# Altium PCB PCB.PcbDoc (part 5 of 8)
Units mm, origin at the board's own origin, x right, y up, seen from the top; angles counter-clockwise.
Board outline 78.8 x 69 mm, 12 copper layers (Top Layer, GND_12, uStrip1, GND_35, Clocks, GND_57, POWER, Slow_Ctrl, GND_810, uStrip2, GND_1012, Bottom Layer), stack 2.926 mm thick; 460 components, 314 nets, 1929 pads, 3409 vias.
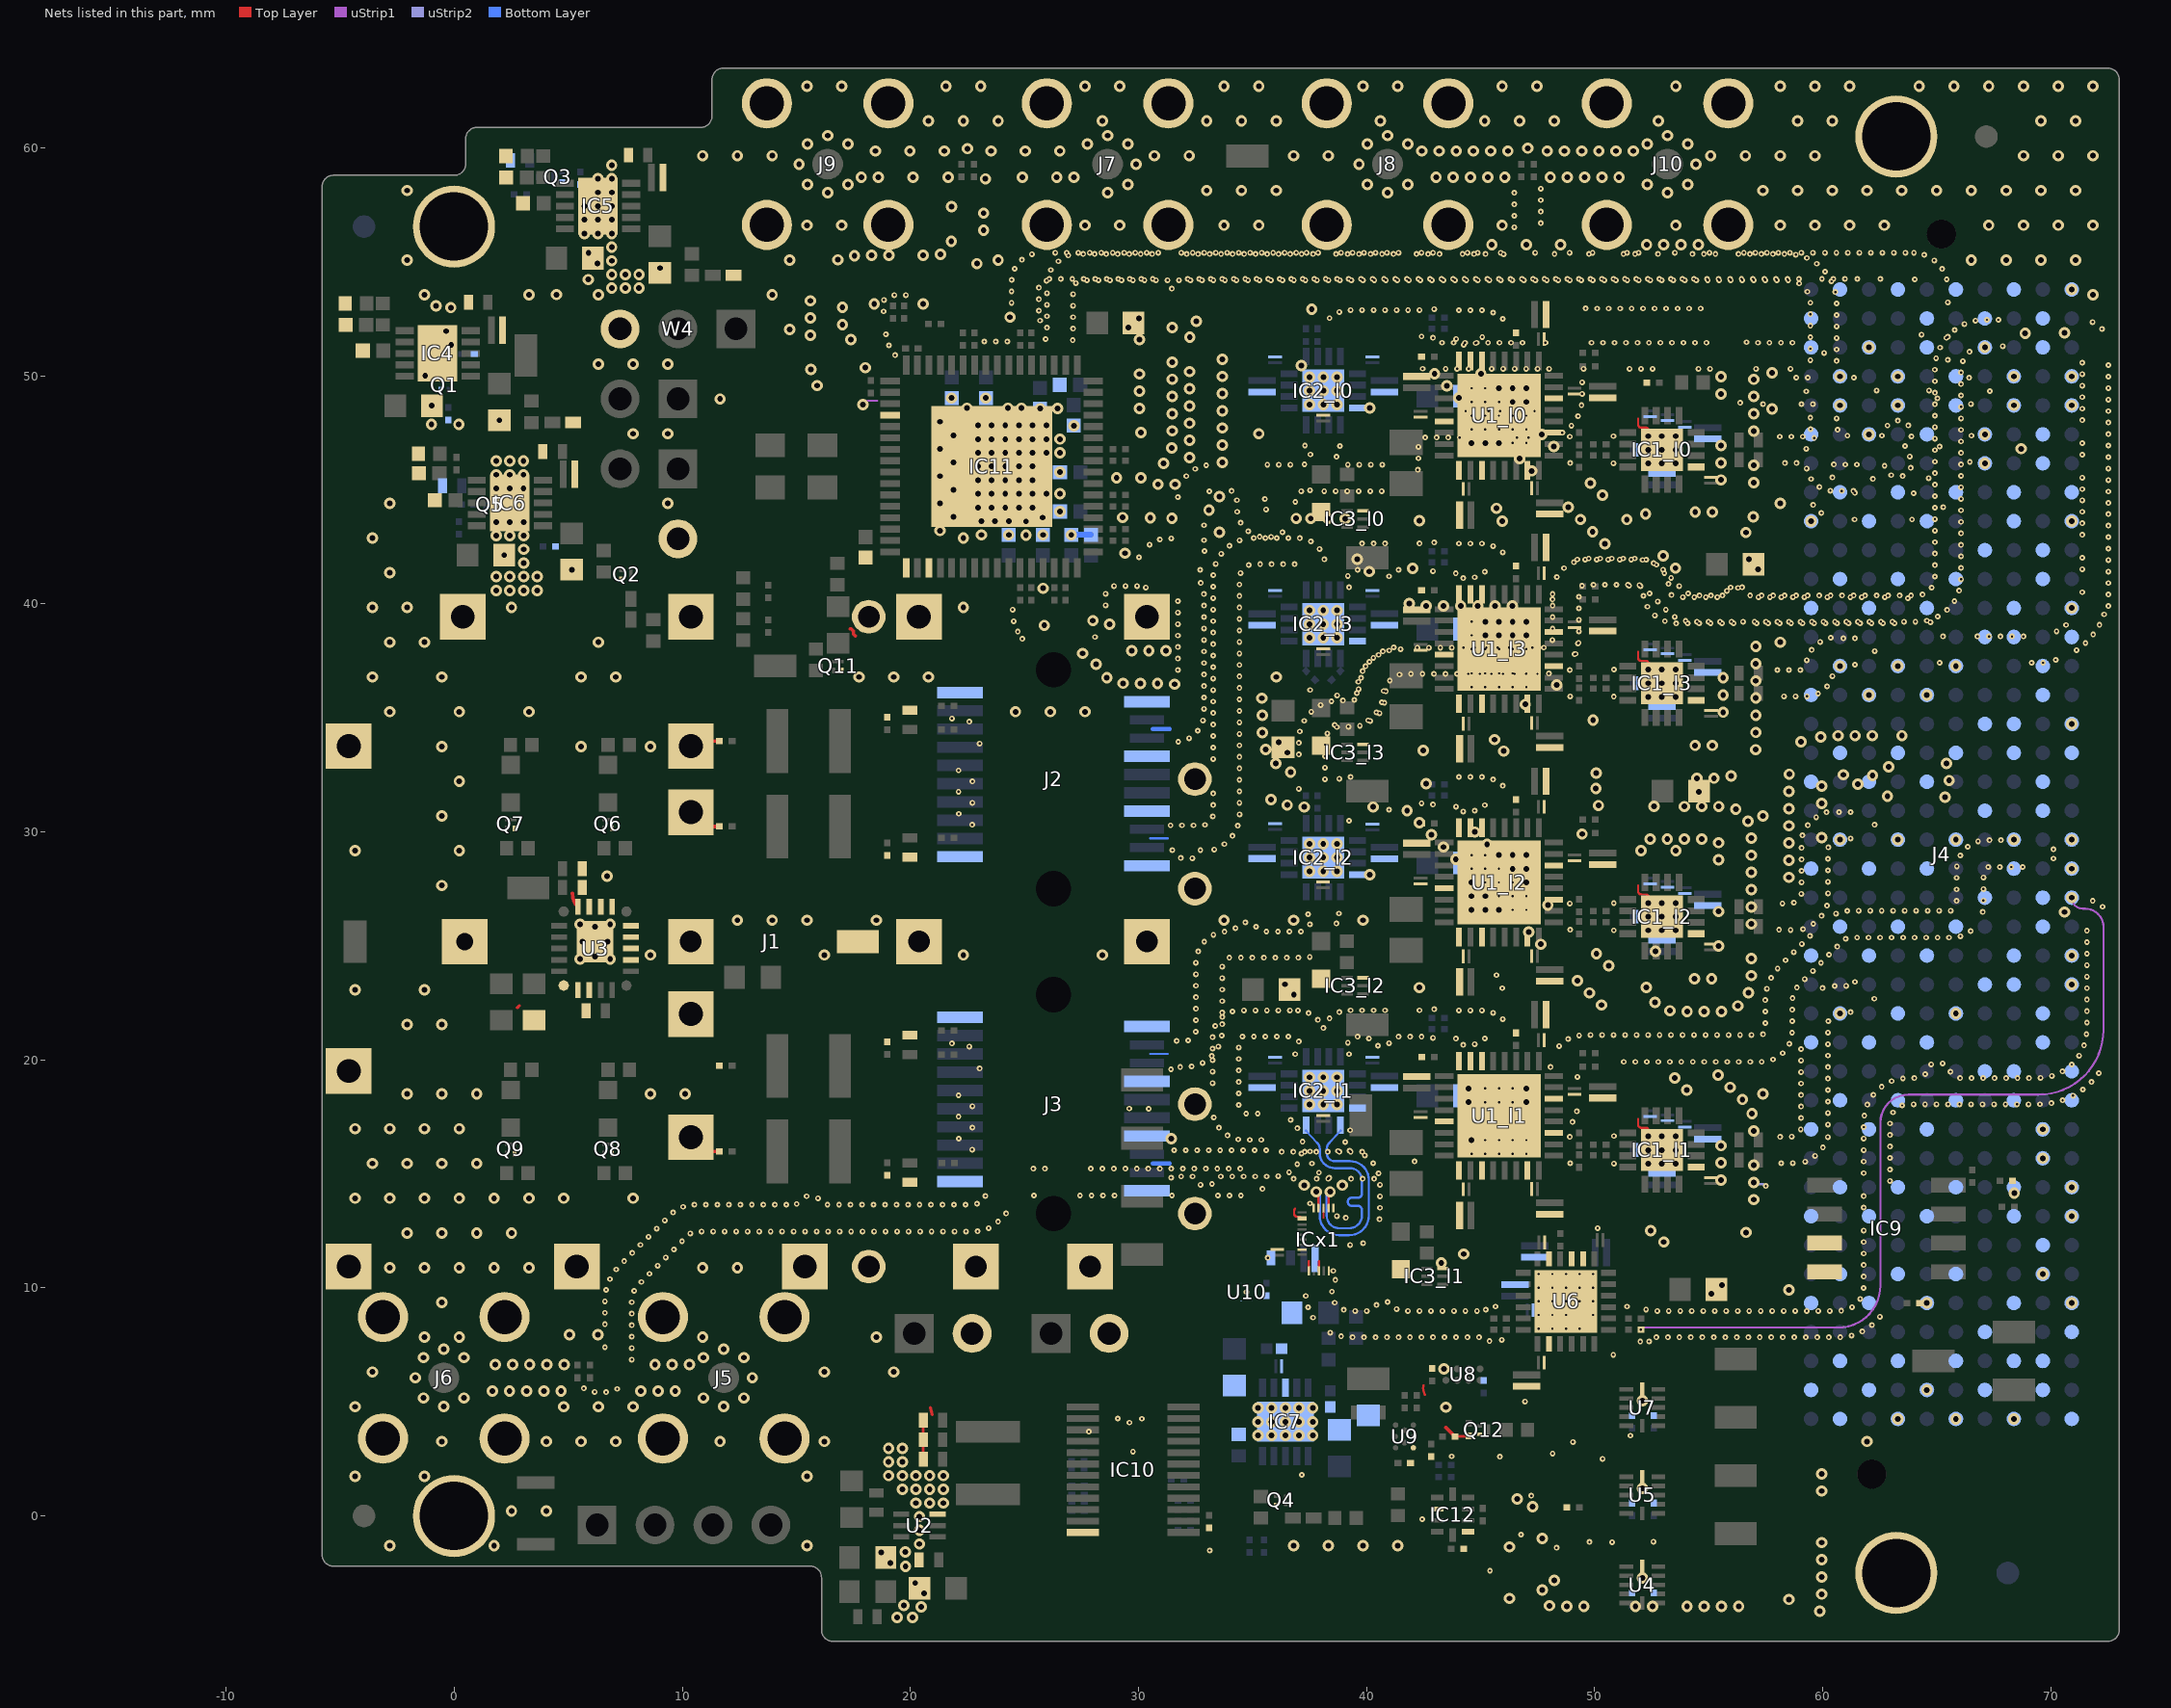
[diagram p14: the nets of this part, all layers, seen from the top]

## Via types
v1: diameter 0.25, hole 0.1, Top Layer to uStrip1, tented both sides, 1130 vias
v2: diameter 0.25, hole 0.1, uStrip2 to Bottom Layer, tented both sides, 686 vias
v3: diameter 0.5, hole 0.25, Top Layer to Bottom Layer, tented both sides, 674 vias
v4: diameter 0.5, hole 0.25, Top Layer to Bottom Layer, 632 vias
v5: diameter 0.5, hole 0.25, uStrip1 to uStrip2, tented both sides, 281 vias
v6: diameter 0.584, hole 0.483, Top Layer to Bottom Layer, tented both sides, 6 vias

## Nets (pads, with @x,y where several pads share a name; then routed paths per layer and width w, separated by ;. In a path a pad name is that pad's centre, name@x,y a point inside that pad or via, vN(x,y) a via of type N, cw(c..) or ccw(c..) an arc to the next point about the centre after c; other vN are vias at no path point) (continued)
FPGA_TX1_P: C83.2 J4.A22 | length 37.5
  uStrip1 w0.094: v1(52.027,8.165) cw(c52.124,8.165) 52.124,8.263 60.685,8.263 ccw(c60.685,10.104) 62.527,10.104 62.527,17.251 cw(c63.755,17.251) 63.755,18.479 66.771,18.479 69.464,18.479 ccw(c69.464,21.324) 72.309,21.324 72.309,25.832 ccw(c71.503,25.832) 71.503,26.637 71.4,26.637 cw(c71.4,27.12) v5(70.918,27.12)
  other v2: 70.918,27.12
FPGA_TX1_PS_N: IC2_l1.4 ICx1.7 | length 10.3
  Top Layer w0.099: ICx1.7@38.328,13.507 38.328,14.146 cw(c38.399,14.146) v1(38.399,14.216)
  Bottom Layer w0.099: IC2_l1.4@37.341,16.896 37.829,16.369 cw(c37.542,16.082) 37.947,16.082 37.947,15.907 ccw(c38.598,15.907) 38.598,15.256 39.273,15.256 cw(c39.273,14.737) 39.793,14.737 39.793,14.535 39.793,14.133 cw(c39.617,14.133) 39.617,13.956 39.348,13.956 ccw(c39.348,13.78) 39.348,13.603 39.617,13.603 cw(c39.617,13.427) 39.793,13.427 39.793,13.178 cw(c39.232,13.178) 39.232,12.617 38.802,12.617 cw(c38.802,13.169) 38.25,13.169 38.25,14.068 cw(c38.399,14.068) v1(38.399,14.216)
  other v2: 38.399,14.216
  other v5: 38.399,14.216
FPGA_TX1_PS_P: IC2_l1.1 ICx1.9 | length 10.3
  Top Layer w0.099: v2(37.797,14.216) cw(c37.797,14.123) 37.89,14.123 ICx1.9@37.89,13.507
  Bottom Layer w0.099: v2(37.797,14.216) cw(c37.797,14.068) 37.945,14.068 37.945,13.169 ccw(c38.802,13.169) 38.802,12.312 39.232,12.312 ccw(c39.232,13.178) 40.098,13.178 40.098,14.737 ccw(c39.273,14.737) 39.273,15.561 38.598,15.561 cw(c38.598,15.907) 38.252,15.907 38.252,16.082 cw(c38.658,16.082) 38.371,16.369 IC2_l1.1@38.859,16.896
  other v1: 37.797,14.216
  other v5: 37.797,14.216
GND: C1_l0.1 C1_l1.1 C1_l2.1 C1_l3.1 C2_l0.1 C2_l1.1 C2_l2.1 C2_l3.1 C3_l0.1 C3_l1.1 C3_l2.1 C3_l3.1 C4_l0.1 C4_l1.1 C4_l2.1 C4_l3.1 C5_l0.1 C5_l1.1 C5_l2.1 C5_l3.1 C6_l0.1 C6_l1.1 C6_l2.1 C6_l3.1 C7_l0.1 C7_l1.1 C7_l2.1 C7_l3.1 C8_l0.1 C8_l1.1 C8_l2.1 C8_l3.1 C9_l0.1 C9_l1.1 C9_l2.1 C9_l3.1 C10_l0.1 C10_l1.1 C10_l2.1 C10_l3.1 C11_l0.1 C11_l1.1 C11_l2.1 C11_l3.1 C14_l0.1 C14_l1.1 C14_l2.1 C14_l3.1 C15_l0.1 C15_l1.1 C15_l2.1 C15_l3.1 C16_l0.1 C16_l1.1 C16_l2.1 C16_l3.1 C17_l0.1 C17_l1.1 C17_l2.1 C17_l3.1 C19_l0.1 C19_l1.1 C19_l2.1 C19_l3.1 C20_l0.1 C20_l1.1 C20_l2.1 C20_l3.1 C21_l0.1 C21_l1.1 C21_l2.1 C21_l3.1 C22_l0.1 C22_l1.1 C22_l2.1 C22_l3.1 C23_l0.1 C23_l1.1 C23_l2.1 C23_l3.1 C25_l0.1 C25_l1.1 C25_l2.1 C25_l3.1 C26_l0.1 C26_l1.1 C26_l2.1 C26_l3.1 C27_l0.1 C27_l1.1 C27_l2.1 C27_l3.1 C28_l0.1 C28_l1.1 C28_l2.1 C28_l3.1 C31_l0.1 C31_l1.1 C31_l2.1 C31_l3.1 C33.1 C34.1 C35.1 C36.1 C37.1 C38.1 C39.1 C40.2 C42.2 C43.1 C44.1 C45.1 C46.1 C47.1 C49.1 C50.1 C51.1 C52.1 C53.1 C54.1 C55.1 C56.1 C57.1 C58.1 C59.1 C60.1 C61.1 C62.1 C63.2 C64.1 C65.1 C66.1 C67.1 C68.2 C69.1 C70.1 C71.1 C72.1 C73.1 C74.1 C75.1 C76.1 C77.1 C78.1 C79.1 C80.1 C89.1 C90.1 C92.1 C93.1 C94.1 C95.1 C115.1 C116.1 C117.1 C118.1 C121.1 C122.1 C123.1 C124.1 C125.1 C126.1 C127.1 C128.1 C129.1 C130.1 C131.1 C132.1 C133.1 C134.1 C135.1 C136.1 C137.1 C138.1 C139.1 C142.1 C145.2 C146.1 C147.1 C148.2 C149.2 C150.1 C151.1 D1.1 D2.1 IC1_l0.9 IC1_l0.17 IC1_l1.9 IC1_l1.17 IC1_l2.9 IC1_l2.17 IC1_l3.9 IC1_l3.17 IC2_l0.16 IC2_l0.17 IC2_l1.16 IC2_l1.17 IC2_l2.16 IC2_l2.17 IC2_l3.16 IC2_l3.17 IC3_l0.3 IC3_l1.3 IC3_l2.3 IC3_l3.3 IC4.11 IC5.11 IC6.11 IC7.8 IC7.11 IC9.3 IC9.4 IC10.12 IC11.4 IC11.17 IC11.19 IC11.65 IC12.1 IC12.7 ICx1.1 ICx1.3 ICx1.5 ICx1.6 ICx1.8 ICx1.10 ICx1.12 ICx1.18 J1.1 J1.2 J1.3 J1.4 J1.5 J1.6 J1.7 J1.8 J1.9 J1.10 J1.11 J1.12 J1.13 J1.14 J1.15 J1.16 J1.17 J1.18 J1.19 J1.20 J1.21 J1.22 J1.23 J1.24 J1.25 J1.26 J1.27 J1.28 J1.29 J1.30 J1.31 J1.32 J1.33 J1.34 J1.35 J1.36 J1.37 J2.1 J2.10 J2.11 J2.14 J2.17 J2.20 J3.1 J3.10 J3.11 J3.14 J3.17 J3.20 J4.A1 J4.A4 J4.A5 J4.A8 J4.A9 J4.A12 J4.A13 J4.A16 J4.A17 J4.A20 J4.A21 J4.A24 J4.A25 J4.A28 J4.A29 J4.A32 J4.A33 J4.A36 J4.A37 J4.A40 J4.B2 J4.B3 J4.B6 J4.B7 J4.B10 J4.B11 J4.B14 J4.B15 J4.B18 J4.B19 J4.B22 J4.B23 J4.B26 J4.B27 J4.B30 J4.B31 J4.B34 J4.B35 J4.B38 J4.B39 J4.C1 J4.C4 J4.C5 J4.C8 J4.C9 J4.C12 J4.C13 J4.C16 J4.C17 J4.C20 J4.C21 J4.C24 J4.C25 J4.C28 J4.C29 J4.C32 J4.C33 J4.C36 J4.C38 J4.C40 J4.D2 J4.D3 J4.D6 J4.D7 J4.D10 J4.D13 J4.D16 J4.D19 J4.D22 J4.D25 J4.D28 J4.D37 J4.D39 J4.E1 J4.E4 J4.E5 J4.E8 J4.E11 J4.E14 J4.E17 J4.E20 J4.E23 J4.E26 J4.E29 J4.E32 J4.E35 J4.E38 J4.E40 J4.F2 J4.F3 J4.F6 J4.F9 J4.F12 J4.F15 J4.F18 J4.F21 J4.F24 J4.F27 J4.F30 J4.F33 J4.F36 J4.F39 J4.G1 J4.G4 J4.G5 J4.G8 J4.G11 J4.G14 J4.G17 J4.G20 J4.G23 J4.G26 J4.G29 J4.G32 J4.G35 J4.G38 J4.G40 J4.H3 J4.H6 J4.H9 J4.H12 J4.H15 J4.H18 J4.H21 J4.H24 J4.H27 J4.H30 J4.H33 J4.H36 J4.H39 J4.I1 J4.I4 J4.I5 J4.I8 J4.I11 J4.I14 J4.I17 J4.I20 J4.I23 J4.I26 J4.I29 J4.I32 J4.I35 J4.I38 J4.I40 J4.J2 J4.J3 J4.J6 J4.J9 J4.J12 J4.J15 J4.J18 J4.J21 J4.J24 J4.J27 J4.J30 J4.J33 J4.J36 J4.J39 J5.2 J5.2_1 J5.2_2 J5.2_3 J6.2 J6.2_1 J6.2_2 J6.2_3 J7.2 J7.2_1 J7.2_2 J7.2_3 J8.2 J8.2_1 J8.2_2 J8.2_3 J9.2 J9.2_1 J9.2_2 J9.2_3 J10.2 J10.2_1 J10.2_2 J10.2_3 LED1_l0.1 LED1_l1.1 LED1_l2.1 LED1_l3.1 pad.frame-holes Q1.2 Q2.2 Q3.2 Q4.2 Q5.2 Q6.2 Q7.2 Q8.2 Q9.2 Q11.2 Q12.2 R5_l0.1 R5_l1.1 R5_l2.1 R5_l3.1 R10.1 R12.1 R16.1 R18.1 R22.1 R26.1 R27.1 R30.1 R32.1 R35.1 R39.1 R40.1 R59.1 R64.1 R78.1 R79.1 TP6.1 U1_l0.6 U1_l0.7 U1_l0.8 U1_l0.13 U1_l0.17 U1_l0.19 U1_l0.23 U1_l0.27 U1_l0.30 U1_l0.33 U1_l1.6 U1_l1.7 U1_l1.8 U1_l1.13 U1_l1.17 U1_l1.19 U1_l1.23 U1_l1.27 U1_l1.30 U1_l1.33 U1_l2.6 U1_l2.7 U1_l2.8 U1_l2.13 U1_l2.17 U1_l2.19 U1_l2.23 U1_l2.27 U1_l2.30 U1_l2.33 U1_l3.6 U1_l3.7 U1_l3.8 U1_l3.13 U1_l3.17 U1_l3.19 U1_l3.23 U1_l3.27 U1_l3.30 U1_l3.33 U2.3 U3.3 U3.4 U3.5 U3.6 U3.8 U3.9 U3.10 U3.11 U3.18 U3.19 U3.20 U3.23 U4.6 U5.6 U6.8 U6.9 U6.11 U6.20 U6.25 U7.6 U8.4 U9.1 U10.2 U10.3 W1.2 W2.2 W4.3 W7.1 | length 22.6
  Top Layer w0.094: 36.864,13.473 ccw(c36.969,13.368) 36.82,13.368 36.82,13.268 ccw(c36.969,13.268) 36.969,13.12 37.059,13.12 cw(c37.059,13.026) 37.104,13.108 37.116,13.102 ICx1.12@37.169,13.049 ; ICx1.1@37.469,10.757 37.469,11.184 ; ICx1.3@37.906,10.757 37.906,11.184 ; 38.109,13.08 ICx1.8@38.109,13.507 ; 51.9,17.42 cw(c51.806,17.412) 51.9,17.412 51.9,17.175 ccw(c52.049,17.175) 52.049,17.027 52.255,17.027 cw(c52.255,16.933) 52.321,17 ; 51.9,27.656 cw(c51.806,27.648) 51.9,27.648 51.9,27.411 ccw(c52.049,27.411) 52.049,27.263 52.255,27.263 cw(c52.255,27.169) 52.321,27.236 52.392,27.164 52.722,26.835 cw(c52.174,26.286) v4(52.949,26.286) ; 51.9,37.893 cw(c51.806,37.884) 51.9,37.884 51.9,37.648 ccw(c52.049,37.648) 52.049,37.499 52.255,37.499 cw(c52.255,37.405) 52.321,37.472 52.392,37.401 52.722,37.071 cw(c52.174,36.523) v4(52.949,36.523) ; 51.9,48.129 cw(c51.806,48.121) 51.9,48.121 51.9,47.884 ccw(c52.049,47.884) 52.049,47.736 52.255,47.736 cw(c52.255,47.642) 52.321,47.709 52.392,47.637 52.722,47.308 cw(c52.174,46.759) v4(52.949,46.759) ; 52.321,16.999 52.392,16.928 52.722,16.598 cw(c52.174,16.05) v4(52.949,16.05)
  Top Layer w0.102: 42.484,5.675 cw(c42.882,5.618) 42.496,5.731 ccw(c42.882,5.618) 42.495,5.507 42.551,5.314
  Top Layer w0.127: 2.756,22.287 2.847,22.378 ; C42.2@20.56,2.489 C44.1@20.56,3.343 C45.1@20.56,4.197 ; 20.873,4.753 20.958,4.434 ; R79.1@43.872,3.49 C148.2@44.417,3.49
  Top Layer w0.152: 5.176,27.308 ccw(c6.015,27.308) 5.197,27.12 ccw(c5.346,27.155) 5.207,27.092 cw(c5.047,27.015) 5.223,27.041 ccw(c5.373,27.064) 5.23,27.013 ccw(c6.015,27.308) 5.373,26.768 U3.11@5.422,26.715 ; J1.7@10.598,15.99 C80.1@11.628,15.99 ; J1.10@10.598,30.238 C74.1@11.628,30.238 ; J1.11@10.598,33.992 C71.1@11.628,33.992 ; 17.368,38.906 17.395,38.906 17.499,38.802 17.499,38.676 17.588,38.588 ; 43.476,3.885 R79.1@43.872,3.49 ; C148.2@44.417,3.49 ccw(c44.417,3.568) C148.2@44.473,3.512 ; U6.25@48.742,9.408 v1(48.742,9.415)
  uStrip1 w0.089: v3@18.08,48.915 18.553,48.918
  uStrip2 w0.102: v5(56.974,14.631) 57.048,14.558 57.377,14.558 57.463,14.471 v2(57.504,14.471)
  Bottom Layer w0.102: 30.524,20.265 31.275,20.265 ; 30.524,29.715 31.275,29.715
  Bottom Layer w0.178: 30.626,15.465 31.377,15.465 ; 30.626,34.515 31.377,34.515
  Bottom Layer w0.254: v4(27.05,43.03) C128.1@27.917,43.03
  other v1: 45.41,-2.4 33.121,-1.514 48.328,-1.39 49.773,-1.141 50.765,-1.147 52.574,-1.129 46.775,-0.817 42.433,-0.139 47.223,0.886 37.161,1.803 50.345,2.505 43.731,2.618 45.845,2.601 48.155,2.742 29.755,2.825 49.049,3.247 51.566,3.526 29.601,4.097 30.144,4.263 29.09,4.276 46.946,5.018 6.153,5.44 6.657,5.433 7.141,5.574 5.676,5.602 7.781,6.858 50.817,7.07 7.781,7.362 6.601,7.399 51.999,7.647 45.388,7.673 52.384,7.656 45.925,7.725 39.384,7.841 39.888,7.841 40.392,7.841 40.896,7.841 41.4,7.841 41.904,7.841 42.408,7.841 42.912,7.841 43.416,7.841 43.92,7.841 44.424,7.841 44.928,7.841 52.703,7.841 53.207,7.841 53.711,7.841 54.215,7.841 54.719,7.841 55.223,7.841 55.727,7.841 56.231,7.841 56.735,7.841 57.239,7.841 57.743,7.841 58.247,7.841 58.751,7.841 59.255,7.841 59.759,7.841 60.263,7.841 60.767,7.84 7.781,7.866 38.881,7.879 61.266,7.913 38.405,8.043 61.736,8.094 47.547,8.22 48.144,8.22 48.742,8.22 49.339,8.22 7.781,8.37 62.155,8.375 6.601,8.407 37.653,8.702 62.502,8.74 47.547,8.818 48.144,8.818 48.742,8.818 49.936,8.818 7.781,8.874 6.601,8.911 39.501,8.989 40.005,8.989 41.814,8.989 42.318,8.989 42.822,8.989 43.326,8.989 43.83,8.989 44.334,8.989 44.838,8.989 52.744,8.989 53.248,8.989 53.752,8.989 54.256,8.989 54.76,8.989 55.264,8.989 55.768,8.989 56.272,8.989 56.776,8.989 57.28,8.989 57.784,8.989 58.288,8.989 58.792,8.989 59.296,8.989 59.8,8.989 60.304,8.989 60.808,9.002 39,9.041 45.222,9.048 52.255,9.055 41.318,9.079 37.434,9.156 61.287,9.16 45.65,9.186 40.433,9.256 38.605,9.354 7.781,9.378 40.919,9.387 6.601,9.415 47.547,9.415 48.144,9.415 49.339,9.415 49.936,9.415 61.641,9.518 37.338,9.65 38.481,9.843 7.889,9.87 6.653,9.916 47.547,10.012 48.144,10.012 48.742,10.012 49.339,10.012 49.936,10.012 61.79,10 8.202,10.265 38.629,10.352 6.825,10.39 61.8,10.504 8.558,10.622 47.547,10.61 48.144,10.61 48.742,10.61 49.339,10.61 49.936,10.61 38.539,10.749 7.1,10.813 8.915,10.978 61.8,11.008 7.447,11.178 9.271,11.334 7.803,11.535 61.8,11.512 9.627,11.691 8.16,11.891 61.8,12.016 9.984,12.047 8.516,12.247 10.348,12.395 10.846,12.475 11.35,12.475 11.854,12.475 12.358,12.475 12.862,12.475 13.366,12.475 13.87,12.475 14.374,12.475 14.878,12.475 15.382,12.475 15.886,12.475 16.39,12.475 16.894,12.475 17.398,12.475 17.902,12.475 18.406,12.475 18.91,12.475 19.414,12.475 19.918,12.475 20.422,12.475 20.926,12.475 21.43,12.475 21.934,12.475 22.438,12.475 22.941,12.487 61.8,12.52 8.873,12.604 23.427,12.624 23.841,12.911 9.229,12.96 24.194,13.271 9.593,13.309 61.8,13.528 10.03,13.559 10.525,13.656 11.029,13.655 11.533,13.655 12.037,13.655 12.541,13.655 13.045,13.655 13.549,13.655 14.053,13.655 14.557,13.655 16.365,13.654 16.869,13.654 17.373,13.654 17.877,13.654 18.381,13.654 18.885,13.654 19.389,13.654 19.893,13.654 20.397,13.654 20.901,13.654 21.405,13.654 21.909,13.654 22.413,13.654 15.012,13.686 22.915,13.694 15.945,13.934 15.449,14.023 23.288,14.033 61.8,14.032 25.418,14.053 27.434,14.053 27.938,14.053 28.442,14.053 28.946,14.053 31.466,14.053 33.482,14.053 33.986,14.053 34.49,14.053 35.435,14.348 62.949,14.693 36.804,14.791 37.812,14.791 38.316,14.791 39.324,14.791 39.828,14.791 40.332,14.791 61.8,15.04 62.949,15.197 25.389,15.232 25.893,15.232 27.909,15.232 28.413,15.232 28.917,15.232 29.421,15.232 29.925,15.232 30.429,15.232 30.933,15.232 31.437,15.232 31.941,15.232 32.445,15.232 32.949,15.232 33.453,15.232 33.957,15.232 34.461,15.232 48.925,15.472 50.841,15.458 58.182,15.472 58.686,15.477 59.228,15.539 61.8,15.544 42.105,15.551 62.949,15.701 59.664,15.792 44.604,15.884 45.204,15.884 45.804,15.884 46.404,15.884 47.004,15.884 36.28,15.97 36.784,15.97 37.288,15.97 37.792,15.97 38.296,15.97 38.8,15.97 39.304,15.97 39.808,15.97 61.8,16.048 22.705,16.069 60.006,16.163 62.949,16.205 45.204,16.484 45.804,16.484 46.404,16.484 47.004,16.484 22.118,16.551 61.8,16.552 48.913,16.628 58.134,16.629 58.638,16.642 60.221,16.618 50.845,16.666 62.949,16.709 59.034,16.954 22.714,17.033 61.8,17.056 60.231,17.169 62.949,17.213 49.024,17.281 59.049,17.456 22.109,17.515 61.823,17.559 60.231,17.673 63.082,17.699 49.215,17.748 30.449,17.86 29.593,17.869 59.049,17.96 22.714,17.969 63.481,18.008 61.958,18.045 63.982,18.057 64.486,18.057 64.99,18.057 65.494,18.057 65.998,18.057 66.502,18.057 67.006,18.057 67.51,18.057 68.014,18.057 68.518,18.057 69.022,18.057 69.526,18.057 70.028,18.108 45.203,18.15 45.803,18.15 46.403,18.15 60.231,18.177 70.515,18.235 70.978,18.435 22.109,18.452 59.049,18.464 62.222,18.474 60.231,18.681 71.405,18.703 45.203,18.75 45.803,18.75 46.403,18.75 62.583,18.825 59.049,18.968 71.785,19.034 63.022,19.073 60.231,19.185 63.513,19.189 64.016,19.205 66.022,19.205 66.526,19.205 67.03,19.205 67.534,19.205 68.038,19.205 68.542,19.205 69.046,19.205 69.55,19.215 49.244,19.259 70.047,19.302 64.49,19.377 72.11,19.419 59.049,19.472 65.602,19.484 70.51,19.5 31.424,19.591 23.035,19.63 60.231,19.689 31.825,19.691 48.064,19.69 32.329,19.716 64.756,19.805 70.916,19.799 65.258,19.852 32.808,19.872 51.278,19.917 51.782,19.917 52.286,19.917 52.79,19.917 53.294,19.917 53.798,19.917 54.302,19.917 54.806,19.917 55.31,19.917 55.814,19.917 56.318,19.917 56.822,19.917 57.326,19.917 59.049,19.976 57.818,20.025 33.212,20.174 60.231,20.193 71.239,20.186 58.241,20.298 59.049,20.48 22.577,20.589 33.5,20.587 48.443,20.61 71.455,20.641 44.237,20.661 44.74,20.696 60.231,20.697 21.82,20.727 58.531,20.71 31.672,20.839 32.175,20.86 48.838,20.923 43.913,20.937 45.18,20.942 33.646,21.069 49.318,21.076 49.822,21.096 50.326,21.096 50.83,21.096 51.334,21.096 51.838,21.096 52.342,21.096 52.846,21.096 53.35,21.096 53.854,21.096 54.358,21.096 54.862,21.096 55.366,21.096 55.87,21.096 56.374,21.096 56.878,21.096 57.381,21.126 71.563,21.134 58.656,21.198 60.231,21.201 32.505,21.24 33.667,21.573 57.48,21.62 71.582,21.638 58.659,21.702 60.242,21.705 32.518,21.744 45.969,21.792 33.667,22.077 45.546,22.066 61.22,22.097 57.48,22.124 71.582,22.142 44.046,22.175 44.55,22.175 45.054,22.176 58.659,22.206 32.518,22.248 33.667,22.581 57.478,22.628 71.582,22.646 62.265,22.685 58.677,22.71 32.518,22.752 33.667,23.085 57.552,23.127 45.947,23.152 59.99,23.154 71.582,23.15 58.867,23.177 60.523,23.244 32.518,23.256 61.027,23.253 61.411,23.423 59.21,23.546 33.667,23.589 57.735,23.596 71.582,23.654 45.693,23.72 32.518,23.76 59.566,23.903 58.02,24.012 33.667,24.093 71.582,24.158 59.922,24.259 32.516,24.264 58.37,24.374 33.982,24.486 34.486,24.486 34.99,24.486 35.494,24.486 35.998,24.486 36.502,24.486 37.006,24.486 37.509,24.519 60.279,24.616 71.582,24.662 58.726,24.731 32.618,24.758 60.635,24.972 59.083,25.087 71.582,25.166 32.881,25.188 61.006,25.313 61.507,25.367 62.011,25.367 62.515,25.367 63.019,25.367 63.523,25.367 64.027,25.367 64.531,25.367 65.035,25.367 65.539,25.367 66.04,25.424 59.439,25.444 33.285,25.489 33.77,25.625 35.609,25.634 36.113,25.634 36.617,25.634 37.121,25.634 66.487,25.656 71.582,25.67 48.925,25.708 50.838,25.685 58.086,25.708 58.59,25.704 59.138,25.738 34.25,25.782 35.151,25.845 37.516,25.948 38.675,25.985 59.586,25.969 34.685,26.036 59.946,26.321 37.434,26.394 60.582,26.42 38.788,26.426 67.018,26.491 61.072,26.541 61.576,26.547 62.08,26.547 62.584,26.547 63.088,26.547 63.592,26.547 64.096,26.547 64.6,26.547 65.104,26.547 65.608,26.547 46.403,26.586 47.003,26.586 72.27,26.722 60.186,26.764 48.913,26.865 50.838,26.877 58.233,26.865 58.736,26.9 65.868,26.978 71.835,26.977 67.047,26.995 45.803,27.186 46.403,27.186 47.003,27.186 59.06,27.286 60.234,27.309 65.868,27.482 67.047,27.499 45.203,27.786 45.803,27.786 46.403,27.786 59.075,27.79 60.231,27.813 65.868,27.986 67.047,28.003 59.075,28.294 60.231,28.317 44.603,28.386 45.203,28.386 45.803,28.386 67.258,28.46 67.762,28.46 68.266,28.46 68.77,28.46 65.881,28.49 59.075,28.798 60.231,28.821 70.116,28.834 32.357,28.847 31.853,28.86 66.035,28.97 44.603,28.986 45.203,28.986 31.483,29.203 32.713,29.203 33.322,29.23 70.113,29.24 59.071,29.302 60.242,29.325 66.363,29.353 33.766,29.468 66.809,29.587 67.31,29.64 67.814,29.64 61.22,29.717 34.119,29.827 59.11,29.849 34.349,30.276 31.404,30.289 31.908,30.289 32.412,30.289 59.349,30.292 22.705,30.317 32.915,30.31 62.274,30.313 59.712,30.642 33.258,30.68 34.43,30.773 22.119,30.799 60.165,30.863 60.716,30.873 61.22,30.873 44.237,30.897 44.74,30.933 43.919,31.107 33.275,31.183 45.18,31.179 22.714,31.281 34.423,31.277 33.275,31.687 22.109,31.763 34.423,31.781 45.969,32.028 22.714,32.217 34.423,32.285 45.546,32.303 44.046,32.411 44.55,32.411 45.054,32.412 22.109,32.699 34.423,32.789 33.275,33.199 34.423,33.293 33.275,33.703 34.423,33.797 23.035,33.878 33.275,34.207 34.423,34.301 38.602,34.692 33.275,34.711 34.423,34.805 22.577,34.836 40.064,34.895 21.82,34.975 33.275,35.215 40.428,35.243 34.423,35.309 40.665,35.688 33.275,35.719 34.423,35.813 48.925,35.945 50.84,35.934 58.301,35.945 58.805,35.945 59.309,35.945 38.706,35.99 59.797,36.071 39.575,36.087 40.745,36.186 33.275,36.223 37.526,36.225 34.423,36.317 44.604,36.356 45.204,36.356 45.804,36.356 46.404,36.356 47.004,36.356 60.19,36.386 39.64,36.586 33.275,36.727 34.423,36.821 60.422,36.833 44.604,36.956 45.204,36.956 45.804,36.956 46.404,36.956 47.004,36.956 39.825,37.055 48.913,37.101 58.011,37.102 58.515,37.102 59.019,37.102 50.845,37.123 33.275,37.231 34.423,37.325 61.409,37.337 40.124,37.461 59.301,37.531 33.275,37.735 40.524,37.767 49.116,37.793 34.423,37.829 62.277,37.934 40.991,37.958 59.518,37.986 41.491,38.019 44.603,38.023 45.203,38.023 45.803,38.023 46.403,38.023 47.003,38.023 33.275,38.239 49.271,38.272 34.423,38.333 59.882,38.334 60.905,38.493 61.409,38.493 60.351,38.518 44.603,38.623 33.275,38.743 34.423,38.837 33.275,39.247 44.603,39.223 54.488,39.224 54.992,39.224 55.496,39.224 56,39.224 56.504,39.224 57.008,39.224 57.512,39.224 58.016,39.224 58.52,39.224 59.024,39.224 59.528,39.224 60.032,39.224 60.536,39.224 61.04,39.224 61.544,39.224 62.048,39.224 62.552,39.224 63.056,39.224 63.56,39.224 64.064,39.224 53.985,39.257 64.566,39.269 34.423,39.341 53.513,39.434 65.037,39.448 33.275,39.751 53.12,39.75 65.451,39.736 34.423,39.845 52.764,40.106 65.773,40.124 48.149,40.2 33.275,40.255 34.423,40.349 54.593,40.373 55.097,40.373 55.601,40.373 56.817,40.373 57.321,40.373 57.825,40.373 58.329,40.373 58.833,40.373 59.337,40.373 59.841,40.373 60.345,40.373 60.849,40.373 61.353,40.373 61.857,40.373 62.361,40.373 62.865,40.373 63.369,40.373 63.873,40.373 64.376,40.414 52.408,40.463 54.097,40.464 65.978,40.584 64.779,40.716 55.961,40.725 56.465,40.734 33.275,40.759 52.014,40.777 53.709,40.786 51.51,40.798 34.423,40.853 66.065,41.08 44.237,41.134 53.353,41.142 44.74,41.169 48.342,41.179 64.917,41.201 33.278,41.263 34.469,41.355 43.91,41.342 45.18,41.415 53,41.502 48.661,41.569 66.066,41.584 34.831,41.706 64.917,41.705 33.386,41.756 35.333,41.743 35.837,41.743 36.341,41.743 36.845,41.743 52.586,41.789 49.091,41.832 52.102,41.93 38.147,41.953 49.582,41.945 50.086,41.946 50.59,41.946 51.094,41.946 51.598,41.946 66.066,42.088 33.629,42.197 64.917,42.209 45.969,42.264 37.933,42.41 45.546,42.539 33.987,42.552 66.066,42.592 44.046,42.648 44.55,42.648 45.054,42.649 64.917,42.713 37.555,42.743 34.432,42.789 35.056,42.892 35.56,42.892 36.064,42.892 36.568,42.892 37.072,42.886 66.066,43.096 64.917,43.217 66.066,43.6 64.917,43.721 66.066,44.104 64.917,44.225 66.066,44.608 64.917,44.729 60.837,44.957 61.341,44.957 60.333,44.97 66.066,45.112 59.856,45.132 64.917,45.233 59.489,45.478 62.199,45.484 63.503,45.61 66.066,45.616 63,45.65 64.917,45.737 59.293,45.942 63.858,45.967 62.71,46.062 60.487,46.12 60.991,46.113 61.495,46.113 66.066,46.12 48.925,46.181 50.822,46.174 58.345,46.181 58.849,46.181 64.917,46.241 63.816,46.47 66.066,46.624 64.917,46.745 63.607,46.928 46.403,47.059 47.003,47.059 66.066,47.128 64.917,47.249 59.625,47.278 48.913,47.338 58.117,47.338 58.621,47.338 59.125,47.338 63.888,47.346 50.822,47.361 61.085,47.379 62.597,47.379 60.651,47.636 66.066,47.632 44.603,47.659 45.203,47.659 45.803,47.659 46.403,47.659 47.003,47.659 59.467,47.668 64.917,47.753 62.837,47.822 63.749,47.831 63.291,48.041 60.608,48.138 66.066,48.136 59.459,48.172 44.603,48.259 45.203,48.259 45.803,48.258 46.403,48.259 47.003,48.259 64.917,48.257 66.066,48.64 59.066,48.767 59.57,48.767 64.917,48.761 44.603,48.859 45.203,48.859 45.803,48.859 66.066,49.144 64.917,49.265 62.362,49.364 44.603,49.459 45.203,49.459 66.066,49.648 64.917,49.769 58.842,49.923 59.346,49.923 61.362,49.923 66.066,50.152 64.915,50.273 66.142,50.651 60.608,50.658 59.459,50.692 64.972,50.774 19.324,50.916 66.434,51.062 60.608,51.162 59.459,51.196 65.145,51.247 67.893,51.308 19.054,51.341 44.257,51.366 44.782,51.438 23.237,51.51 23.741,51.51 24.245,51.51 27.115,51.568 25.928,51.614 43.925,51.622 60.608,51.666 65.42,51.669 45.073,51.704 59.459,51.7 18.921,51.828 65.783,52.019 27.132,52.072 25.983,52.115 60.608,52.17 59.459,52.204 66.215,52.278 66.697,52.427 67.2,52.459 67.704,52.459 45.969,52.501 27.132,52.576 25.983,52.619 60.608,52.674 59.459,52.708 45.546,52.776 18.826,52.829 44.046,52.884 44.55,52.884 45.054,52.885 27.132,53.08 25.983,53.123 60.609,53.178 59.457,53.212 18.838,53.333 19.296,53.543 19.8,53.543 27.132,53.584 25.983,53.627 59.324,53.698 60.554,53.679 58.969,54.056 27.253,54.073 60.381,54.152 25.967,54.18 27.741,54.2 28.245,54.2 28.749,54.2 29.253,54.2 29.757,54.2 30.261,54.2 30.765,54.2 31.269,54.2 31.773,54.2 32.277,54.2 32.781,54.2 33.285,54.2 33.789,54.2 34.293,54.2 34.797,54.2 35.301,54.2 35.805,54.2 36.309,54.2 36.813,54.2 37.317,54.2 37.821,54.2 38.325,54.2 38.829,54.2 39.333,54.2 39.837,54.2 40.341,54.2 40.845,54.2 41.349,54.2 41.853,54.2 42.357,54.2 42.861,54.2 43.365,54.2 43.869,54.2 44.373,54.2 44.877,54.2 45.381,54.2 45.885,54.2 46.389,54.2 46.893,54.2 47.397,54.2 47.901,54.2 48.405,54.2 48.909,54.2 49.413,54.2 49.917,54.2 50.421,54.2 50.925,54.2 51.429,54.2 51.933,54.2 52.437,54.2 52.941,54.2 53.445,54.2 53.949,54.2 54.453,54.2 54.957,54.2 55.461,54.2 55.965,54.2 56.469,54.2 56.973,54.2 57.477,54.2 57.981,54.2 58.485,54.196 60.105,54.574 26.154,54.648 59.74,54.922 26.485,55.029 59.305,55.177 26.918,55.286 58.822,55.319 27.575,55.348 28.079,55.348 28.583,55.348 29.087,55.348 29.591,55.348 30.095,55.348 30.599,55.348 32.111,55.348 32.615,55.348 33.119,55.348 33.623,55.348 34.127,55.348 34.631,55.348 35.135,55.348 35.639,55.348 36.143,55.348 36.647,55.348 37.151,55.348 37.655,55.348 38.663,55.348 39.167,55.348 39.671,55.348 40.175,55.348 40.679,55.348 41.183,55.348 42.191,55.348 42.695,55.348 43.199,55.348 44.207,55.348 44.711,55.348 45.215,55.348 46.003,55.341 48.239,55.348 49.751,55.348 51.263,55.348 51.767,55.348 52.775,55.348 54.287,55.348 54.791,55.348 55.295,55.348 56.303,55.348 56.807,55.348 57.311,55.348 57.815,55.348 58.319,55.348 46.479,56.52 47.635,56.703 46.479,57.024 47.635,57.207 46.479,57.528 47.635,57.711 46.479,58.032 47.635,58.215
  other v2: 27.825,3.702 51.417,9.185 34.737,9.821 35.665,11.327 39.28,11.884 39.852,11.966 50.132,12.626 40.569,13.015 39.091,13.077 38.696,13.155 40.591,13.518 37.519,13.707 40.591,14.022 32.719,14.524 40.591,14.526 33.222,14.562 31.431,14.838 38.357,14.831 31.869,14.891 32.373,14.891 33.604,14.891 34.108,14.891 34.612,14.891 35.116,14.891 35.62,14.891 36.124,14.906 40.523,15.026 37.909,15.06 36.599,15.074 36.959,15.427 37.601,15.46 40.286,15.471 39.92,15.817 37.144,15.896 37.521,15.989 38.742,16.01 39.255,16.019 31.564,16.039 32.068,16.039 32.572,16.039 33.076,16.039 33.58,16.039 34.084,16.039 34.588,16.039 35.092,16.039 35.596,16.039 39.059,16.403 37.192,16.414 34.878,16.496 35.382,16.496 34.374,16.517 33.9,16.688 39.28,16.92 36.964,17.007 33.527,17.028 36.671,17.372 33.297,17.476 34.722,17.644 35.226,17.644 34.395,18.028 34.395,18.532 33.246,18.985 34.395,19.036 33.246,19.489 34.395,19.54 33.246,19.993 34.395,20.044 36.869,20.256 39.228,20.256 33.246,20.497 34.395,20.548 40.496,20.623 40.986,20.74 39.178,20.757 37.026,20.808 40.104,20.94 42.912,20.967 33.247,21.001 34.555,21.026 35.059,21.026 35.563,21.026 36.067,21.026 36.571,21.026 39.607,21.022 41.403,21.022 41.907,21.022 42.411,21.022 38.103,21.403 33.365,21.491 37.863,21.76 38.377,21.826 33.673,21.89 37.457,22.059 38.801,22.098 34.118,22.128 34.62,22.174 35.124,22.174 35.628,22.174 36.132,22.174 36.636,22.174 36.989,22.171 39.298,22.179 39.802,22.179 40.306,22.179 40.81,22.179 42.322,22.179 42.962,22.225 39.228,30.492 40.986,30.976 42.912,31.203 42.411,31.259 37.026,31.891 38.174,32.314 38.801,32.335 39.298,32.416 38.174,32.818 38.174,33.322 37.026,33.403 38.174,33.826 37.026,33.907 31.74,33.954 32.219,34.111 38.28,34.319 37.073,34.409 32.598,34.443 38.698,34.599 39.202,34.618 39.704,34.661 37.263,34.875 40.162,34.872 32.826,34.893 40.568,35.209 37.572,35.273 32.873,35.395 37.983,35.566 40.782,35.666 38.459,35.732 38.962,35.767 39.465,35.795 32.873,35.899 40.847,36.166 39.645,36.266 32.873,36.403 41.015,36.639 39.758,36.757 32.873,36.907 41.443,36.904 41.946,36.935 42.45,36.935 42.954,36.935 43.458,36.935 43.962,36.935 44.466,36.935 44.97,36.935 45.474,36.935 45.978,36.935 46.482,36.935 46.986,36.935 47.49,36.935 47.994,36.951 31.724,37.102 39.957,37.265 32.873,37.411 65.125,37.418 69.157,37.418 69.661,37.418 70.218,37.545 31.724,37.606 40.297,37.638 49.165,37.811 32.873,37.915 40.715,37.919 71.127,37.973 41.187,38.095 42.225,38.084 42.729,38.084 43.233,38.084 43.737,38.084 44.241,38.084 44.745,38.084 45.249,38.084 45.753,38.084 46.257,38.084 46.761,38.084 47.265,38.084 47.769,38.085 31.724,38.11 49.295,38.298 71.52,38.289 32.873,38.419 48.147,38.418 24.902,38.472 28.093,38.55 65.272,38.575 66.784,38.575 67.288,38.575 67.792,38.575 68.296,38.575 68.8,38.575 31.724,38.614 71.859,38.662 24.709,38.787 49.304,38.801 70.252,38.797 32.873,38.923 48.156,38.922 70.67,39.079 72.134,39.084 31.724,39.118 53.572,39.149 54.076,39.152 54.58,39.152 55.084,39.152 55.588,39.152 56.092,39.152 57.1,39.152 57.604,39.152 58.108,39.152 58.612,39.152 59.116,39.152 59.62,39.152 60.124,39.152 60.628,39.152 61.132,39.152 61.636,39.152 62.14,39.152 62.644,39.152 63.148,39.152 64.72,39.201 24.525,39.245 53.077,39.246 49.304,39.305 32.873,39.427 48.156,39.426 52.641,39.499 72.34,39.544 31.724,39.622 24.48,39.747 49.304,39.809 52.313,39.882 32.873,39.931 48.156,39.93 72.525,39.909 28.557,39.94 31.724,40.126 63.729,40.252 49.304,40.313 53.864,40.301 54.368,40.301 54.872,40.301 55.376,40.301 57.179,40.301 57.683,40.301 58.187,40.301 58.691,40.301 59.195,40.301 60.203,40.301 61.211,40.301 61.715,40.301 62.723,40.301 52.139,40.355 53.369,40.394 72.525,40.413 32.864,40.435 48.156,40.434 28.557,40.444 71.376,40.515 55.8,40.574 56.287,40.703 30.319,40.722 39.228,40.728 28.926,40.787 29.43,40.787 29.934,40.787 49.443,40.798 49.945,40.844 50.449,40.844 50.953,40.844 51.457,40.844 51.961,40.826 53.235,40.88 32.729,40.92 72.525,40.917 40.986,41.212 39.178,41.23 53.056,41.351 72.525,41.421 42.912,41.44 32.702,41.496 39.607,41.495 41.403,41.495 71.376,41.523 52.71,41.718 72.525,41.925 49.239,41.953 52.259,41.943 49.741,41.992 50.245,41.992 50.749,41.992 51.253,41.992 51.757,41.992 71.376,42.027 30.021,42.048 32.893,42.321 72.525,42.429 30.484,42.601 39.802,42.652 40.306,42.652 40.81,42.652 42.322,42.652 42.962,42.697 32.874,42.795 30.934,42.827 31.436,42.878 35.311,42.952 35.814,42.937 72.525,42.933 71.376,43.035 36.312,43.144 34.809,43.185 72.525,43.437 32.874,43.452 71.376,43.539 34.476,43.563 61.394,43.703 63.914,43.703 72.525,43.941 59.94,43.992 34.325,44.044 71.376,44.043 35.593,44.142 65.282,44.246 59.581,44.346 72.525,44.427 36.874,44.473 34.315,44.548 71.376,44.547 35.54,44.604 31.723,44.685 63.984,44.855 61.406,44.873 72.525,44.931 33.103,44.938 34.082,44.957 37.135,44.949 38.143,44.949 38.647,44.949 39.151,44.949 39.655,44.949 40.159,44.949 40.663,44.949 37.518,44.99 71.376,45.037 72.525,45.435 64.642,45.514 60.425,45.547 71.376,45.541 32.096,45.607 42.246,45.884 32.488,45.924 72.525,45.939 32.966,46.083 36.153,46.106 36.657,46.106 39.177,46.106 39.681,46.106 40.185,46.106 40.689,46.106 35.649,46.11 37.278,46.122 66.451,46.231 42.274,46.387 38.684,46.456 72.525,46.443 37.533,46.556 71.376,46.549 59.276,46.803 42.274,46.891 65.125,46.903 38.831,46.926 37.297,46.947 72.525,46.947 71.376,47.053 42.566,47.302 43.07,47.302 43.574,47.302 44.078,47.302 46.598,47.302 47.102,47.302 66.516,47.379 72.525,47.451 48.582,47.513 48.981,47.82 72.525,47.955 71.376,48.061 49.27,48.233 44.342,48.458 45.35,48.458 45.854,48.458 47.366,48.458 72.525,48.459 71.376,48.565 49.425,48.713 57.385,48.767 66.497,48.771 56.38,48.824 72.525,48.963 65.03,49.017 71.376,49.069 49.452,49.216 59.276,49.323 67.329,49.334 64.661,49.361 72.525,49.467 71.376,49.573 49.452,49.72 66.419,49.919 72.525,49.971 71.376,50.077 42.458,50.316 43.466,50.311 43.97,50.311 44.474,50.311 45.482,50.311 45.986,50.311 46.49,50.311 46.994,50.311 47.498,50.311 48.002,50.311 49.514,50.311 51.53,50.311 52.034,50.311 52.538,50.311 54.554,50.311 55.058,50.311 57.074,50.311 58.586,50.311 72.525,50.475 71.376,50.581 65.48,50.709 60.062,51.007 43.31,51.459 43.814,51.459 44.318,51.459 44.822,51.459 45.326,51.459 45.83,51.459 46.334,51.459 46.838,51.459 47.846,51.459 49.862,51.459 50.366,51.459 50.87,51.459 51.374,51.459 51.878,51.459 52.382,51.459 52.886,51.459 53.39,51.459 53.894,51.459 54.398,51.459 54.902,51.459 57.16,51.459 57.664,51.459 58.168,51.459 58.672,51.459 56.656,51.479 42.912,51.676 65.48,51.717 42.411,51.732 64.332,51.81 72.241,52.062 71.834,52.359 25.682,52.429 38.377,52.535 38.801,52.808 25.633,52.862 39.298,52.888 39.802,52.888 40.306,52.888 40.81,52.888 41.314,52.888 41.818,52.888 42.322,52.888 42.962,52.934 49.604,52.96 50.108,52.956 50.612,52.956 51.116,52.956 51.62,52.956 52.124,52.956 52.628,52.956 53.132,52.956 53.636,52.956 54.14,52.956 54.644,52.956 24.433,53.204 65.48,53.229 25.633,53.366 24.433,53.708 31.463,53.828 25.633,53.87 24.438,54.212 26.086,54.254 26.59,54.254 27.094,54.254 27.598,54.254 28.102,54.254 28.606,54.254 29.11,54.254 29.614,54.254 30.118,54.254 30.622,54.254 32.158,54.254 32.662,54.254 33.166,54.254 33.67,54.254 34.174,54.254 34.678,54.254 35.182,54.254 35.686,54.254 36.19,54.254 36.694,54.254 37.198,54.254 37.702,54.254 38.206,54.254 38.71,54.254 39.214,54.254 39.755,54.254 40.259,54.254 40.763,54.254 41.267,54.254 41.771,54.254 42.275,54.254 42.779,54.254 43.283,54.254 43.787,54.254 44.291,54.254 44.795,54.254 45.299,54.254 45.803,54.254 46.307,54.254 46.811,54.254 47.292,54.254 47.796,54.254 48.3,54.254 48.804,54.254 49.308,54.254 49.812,54.254 50.316,54.254 50.82,54.254 51.324,54.254 51.828,54.254 52.332,54.254 52.836,54.254 53.34,54.254 53.844,54.254 54.348,54.254 54.924,54.254 55.428,54.254 55.932,54.254 56.436,54.254 56.94,54.254 57.444,54.254 57.948,54.254 58.452,54.254 58.956,54.254 59.964,54.254 60.468,54.254 60.972,54.254 61.516,54.254 62.524,54.254 64.035,54.235 65.435,54.235 24.571,54.698 65.233,54.696 64.891,55.066 24.884,55.093 64.45,55.312 25.323,55.341 64.001,55.401 26.348,55.403 26.852,55.403 27.356,55.403 27.86,55.403 28.364,55.403 28.868,55.403 29.372,55.403 29.855,55.403 30.359,55.403 30.863,55.403 31.871,55.403 32.375,55.403 32.879,55.403 33.383,55.403 33.887,55.403 34.391,55.403 34.895,55.403 35.399,55.403 35.903,55.403 36.407,55.403 36.911,55.403 37.366,55.403 37.87,55.403 38.878,55.403 39.382,55.403 39.886,55.403 40.39,55.403 40.894,55.403 41.398,55.403 42.406,55.403 42.91,55.403 44.422,55.403 44.87,55.403 45.878,55.403 47.39,55.403 48.902,55.403 49.91,55.403 51.422,55.403 51.926,55.403 53.518,55.403 55.03,55.403 56.542,55.403 57.046,55.403 57.55,55.403 58.054,55.403 58.558,55.403 59.062,55.403 59.566,55.403 60.095,55.403 60.599,55.403 61.103,55.403 61.607,55.403 62.111,55.403 62.615,55.403 63.119,55.403 63.623,55.403
  other v3: 19.414,-4.457 20.088,-4.457 20.478,-3.986 19.71,-3.924 48.227,-2.827 52.089,-2.719 -2.827,-1.303 1.745,-1.303 15.461,-1.303 36.797,-1.303 38.321,-1.303 39.845,-1.303 41.369,-1.303 2.507,0.221 4.031,0.221 52.089,1.218 -4.351,1.745 -1.303,1.745 15.461,1.745 -0.541,3.269 4.031,3.269 5.555,3.269 7.079,3.269 11.651,3.269 16.223,3.269 61.943,3.269 63.298,4.26 65.838,4.26 68.378,4.26 -4.351,4.793 4.793,4.793 6.317,4.793 7.841,4.793 52.089,5.057 1.665,5.485 2.419,5.485 3.173,5.485 3.927,5.485 4.681,5.485 8.179,5.485 8.933,5.485 9.687,5.485 64.568,5.53 -3.589,6.317 16.223,6.317 19.271,6.317 43.396,6.456 1.797,6.639 2.551,6.639 3.305,6.639 4.059,6.639 4.813,6.639 8.801,6.639 9.555,6.639 10.309,6.639 -1.303,7.841 0.221,7.841 10.889,7.841 18.509,7.841 64.568,9.34 70.918,9.34 -0.541,9.365 69.648,10.61 -2.827,10.889 -1.303,10.889 0.221,10.889 1.745,10.889 3.269,10.889 10.889,10.889 12.413,10.889 43.277,11.093 44.257,11.49 -2.065,12.413 -0.541,12.413 0.983,12.413 2.507,12.413 70.918,13.15 -4.351,13.937 -2.827,13.937 -1.303,13.937 0.221,13.937 1.745,13.937 3.269,13.937 4.793,13.937 7.841,13.937 68.397,14.158 70.918,14.42 37.262,14.507 38.934,14.507 -3.589,15.461 -2.065,15.461 -0.541,15.461 0.983,15.461 69.648,15.69 69.648,16.96 -4.351,16.985 -2.827,16.985 -1.303,16.985 0.221,16.985 -2.065,18.509 -0.541,18.509 0.983,18.509 8.603,18.509 10.127,18.509 57.371,18.509 -2.065,21.557 -0.541,21.557 60.758,22.04 65.838,22.04 -4.351,23.081 -1.303,23.081 70.918,23.31 6.172,24.54 70.918,24.58 8.603,24.605 16.223,24.605 22.319,24.605 28.415,24.605 5.621,25.191 6.721,25.19 6.172,25.84 12.413,26.129 13.937,26.129 15.461,26.129 18.509,26.129 33.749,26.129 36.797,26.129 39.845,26.129 -0.541,27.653 40.145,28.128 70.918,28.39 -4.351,29.177 0.221,29.177 52.037,29.177 53.561,29.177 60.758,29.66 63.298,29.66 65.838,29.66 68.378,29.66 70.918,29.66 -0.541,30.701 57.371,30.701 0.221,32.225 -0.541,33.749 5.555,33.749 8.603,33.749 70.918,34.74 -2.827,35.273 0.221,35.273 3.269,35.273 24.605,35.273 26.129,35.273 27.653,35.273 62.028,36.01 64.568,36.01 -3.589,36.797 -0.541,36.797 5.555,36.797 7.079,36.797 17.747,36.797 19.271,36.797 20.795,36.797 36.035,36.797 60.758,37.28 63.298,37.28 65.838,37.28 -2.827,38.321 -1.303,38.321 6.317,38.321 58.133,38.321 70.918,39.82 -3.589,39.845 -2.065,39.845 2.507,39.845 22.319,39.845 -2.827,41.369 -3.589,42.893 22.319,42.893 59.488,43.63 70.918,43.63 -2.827,44.417 9.365,44.417 58.133,44.417 67.108,46.17 62.028,47.44 67.108,47.44 7.841,47.465 9.365,47.465 35.273,47.465 40.145,48.599 60.758,48.71 63.298,48.71 68.378,48.71 70.918,48.71 17.918,48.748 11.651,48.989 60.758,49.98 63.298,49.98 68.378,49.98 70.918,49.98 18.024,50.361 6.317,50.513 7.841,50.513 9.365,50.513 62.028,51.25 67.108,51.25 14.699,52.037 -1.303,53.561 3.269,53.561 6.317,53.561 13.937,53.561 71.849,53.561 70.918,53.79 -2.065,55.085 14.699,55.085 23.843,55.085 66.515,55.085 68.039,55.085 69.563,55.085 71.087,55.085 15.461,56.609 16.985,56.609 27.653,56.609 29.177,56.609 33.749,56.609 35.273,56.609 45.941,56.609 53.561,56.609 58.133,56.609 59.657,56.609 61.181,56.609 62.705,56.609 67.277,56.609 68.801,56.609 70.325,56.609 71.849,56.609 -2.065,58.133 32.987,58.133 34.511,58.133 36.035,58.133 57.371,58.133 58.895,58.133 60.419,58.133 61.943,58.133 63.467,58.133 64.991,58.133 66.515,58.133 68.039,58.133 69.563,58.133 71.087,58.133 17.844,58.712 18.598,58.712 20.106,58.712 24.908,58.712 26.416,58.712 27.17,58.712 43.046,58.712 43.8,58.712 44.554,58.712 45.308,58.712 46.062,58.712 48.052,58.712 48.806,58.712 49.56,58.712 50.314,58.712 51.068,58.712 10.889,59.657 12.413,59.657 13.937,59.657 30.701,59.657 32.225,59.657 36.797,59.657 38.321,59.657 55.085,59.657 56.609,59.657 58.133,59.657 59.657,59.657 68.801,59.657 70.325,59.657 71.849,59.657 18.466,59.866 19.974,59.866 21.482,59.866 23.532,59.866 25.04,59.866 26.548,59.866 42.424,59.866 43.178,59.866 43.932,59.866 44.686,59.866 45.44,59.866 46.194,59.866 47.92,59.866 48.674,59.866 49.428,59.866 50.182,59.866 50.936,59.866 51.69,59.866 22.505,59.968 47.063,59.989 20.795,61.181 22.319,61.181 23.843,61.181 28.415,61.181 32.987,61.181 34.511,61.181 36.035,61.181 40.607,61.181 45.179,61.181 46.703,61.181 48.227,61.181 52.799,61.181 58.895,61.181 60.419,61.181 69.563,61.181 71.087,61.181 15.461,62.705 16.985,62.705 21.557,62.705 23.081,62.705 27.653,62.705 29.177,62.705 33.749,62.705 35.273,62.705 39.845,62.705 41.369,62.705 45.941,62.705 47.465,62.705 53.561,62.705 58.133,62.705 59.657,62.705 61.181,62.705 64.229,62.705 65.753,62.705 67.277,62.705 68.801,62.705 70.325,62.705 71.849,62.705
  other v4: 20.599,-3.396 20.207,-2.938 19.786,-2.217 19.118,-2.054 18.726,-1.596 19.777,-1.581 20.395,-1.227 20.395,-0.627 20.395,-0.027 20.242,0.569 20.842,0.569 21.442,0.569 19.642,1.169 20.242,1.169 20.842,1.169 21.442,1.169 19.042,1.769 19.642,1.769 20.242,1.769 20.842,1.769 21.442,1.769 19.042,2.369 19.642,2.369 19.042,2.969 19.642,2.969 35.238,3.534 35.838,3.534 36.438,3.534 37.038,3.534 37.638,3.534 35.238,4.134 35.838,4.134 36.438,4.134 37.038,4.134 37.638,4.134 35.238,4.734 35.838,4.734 36.438,4.734 37.038,4.734 37.638,4.734 43.474,4.771 -0.461,4.809 11.814,4.809 -1.347,5.176 0.424,5.176 10.928,5.176 12.699,5.176 -1.714,6.062 13.066,6.062 -1.347,6.948 0.424,6.948 10.928,6.948 12.699,6.948 -0.461,7.315 11.814,7.315 5.056,7.951 6.296,7.951 55.114,9.74 55.572,10.133 52.349,15.45 52.949,15.45 53.549,15.45 52.349,16.05 53.549,16.05 44.604,16.484 31.435,16.548 52.349,16.65 52.949,16.65 53.549,16.65 37.5,18.041 38.1,18.041 38.7,18.041 44.476,18.15 47.003,18.15 37.5,18.641 38.1,18.641 38.7,18.641 44.476,18.75 47.003,18.75 37.5,19.241 38.1,19.241 38.7,19.241 36.81,22.862 42.32,23.174 36.418,23.321 5.509,24.431 6.835,24.431 52.349,25.686 52.949,25.686 53.549,25.686 5.509,25.949 6.835,25.949 52.349,26.286 53.549,26.286 70.599,26.488 44.603,26.586 45.203,26.586 45.803,26.586 52.349,26.886 52.949,26.886 53.549,26.886 44.603,27.186 45.203,27.186 44.603,27.786 47.003,27.786 6.698,28.06 37.5,28.278 38.1,28.278 38.7,28.278 46.403,28.386 47.003,28.386 37.5,28.878 38.1,28.878 38.7,28.878 45.803,28.986 46.403,28.986 47.003,28.986 37.5,29.478 38.1,29.478 38.7,29.478 54.573,31.751 36.534,33.482 46.013,33.546 42.487,33.577 36.142,33.94 45.616,34.052 52.349,35.923 52.949,35.923 53.549,35.923 52.349,36.523 53.549,36.523 52.349,37.123 52.949,37.123 53.549,37.123 37.5,38.514 38.1,38.514 38.7,38.514 45.203,38.623 45.803,38.623 46.403,38.623 47.003,38.623 37.5,39.114 38.1,39.114 38.7,39.114 45.203,39.223 45.803,39.223 46.403,39.223 47.003,39.223 37.5,39.714 38.1,39.714 38.7,39.714 1.838,40.595 2.438,40.595 3.038,40.595 3.638,40.595 25.809,40.687 1.838,41.195 2.438,41.195 3.038,41.195 3.638,41.195 5.149,41.499 57.163,41.512 3.038,41.795 56.77,41.97 2.186,42.14 29.413,42.226 3.038,42.395 1.838,42.995 2.438,42.995 3.038,42.995 23.108,43.03 24.308,43.03 25.066,43.022 25.808,43.03 21.295,43.217 1.838,43.595 2.438,43.595 3.038,43.595 23.108,43.63 23.708,43.63 24.308,43.63 25.066,43.622 45.947,43.625 42.32,43.647 25.797,43.791 30.518,43.784 21.891,43.813 26.555,44.05 45.693,44.193 22.958,44.23 23.558,44.23 24.158,44.23 24.758,44.23 25.358,44.23 21.294,44.41 22.958,44.83 23.558,44.83 24.158,44.83 24.758,44.83 25.358,44.83 25.958,44.83 26.558,44.83 21.89,45.007 1.834,45.07 2.434,45.07 3.034,45.07 22.958,45.43 23.558,45.43 24.158,45.43 24.758,45.43 25.358,45.43 29.039,45.531 30.104,45.539 21.293,45.604 1.834,45.67 2.434,45.67 3.034,45.67 26.558,45.78 22.958,46.03 23.558,46.03 24.158,46.03 24.758,46.03 25.358,46.03 52.349,46.159 52.949,46.159 53.549,46.159 21.89,46.201 1.834,46.27 2.434,46.27 3.034,46.27 22.958,46.63 23.558,46.63 24.158,46.63 24.758,46.63 25.358,46.63 25.958,46.63 26.558,46.63 52.349,46.759 53.549,46.759 21.292,46.798 68.696,46.808 44.603,47.059 45.203,47.059 45.803,47.059 22.958,47.23 23.558,47.23 24.158,47.23 24.758,47.23 25.358,47.23 25.958,47.23 26.558,47.23 52.349,47.359 52.949,47.359 53.549,47.359 21.889,47.395 30.104,47.522 22.958,47.83 23.558,47.83 24.158,47.83 24.758,47.83 25.358,47.83 25.958,47.83 27.164,47.819 -1.001,47.883 0.199,47.883 21.292,47.992 1.978,48.056 25.683,48.567 57.779,48.549 22.485,48.588 24.273,48.586 24.873,48.586 26.443,48.577 -0.985,48.696 37.503,48.748 38.103,48.748 38.703,48.748 46.403,48.859 47.003,48.859 21.808,49.03 23.308,49.03 37.503,49.348 38.103,49.348 38.703,49.348 45.803,49.459 46.403,49.459 47.003,49.459 15.906,49.576 37.503,49.948 38.103,49.948 38.703,49.948 -1.276,50.006 57.779,50.141 15.635,50.28 -0.135,51.371 17.385,51.597 15.613,51.787 68.876,51.873 70.599,51.888 -0.355,51.963 29.554,52.128 17.016,52.255 30.012,52.521 15.613,52.541 24.366,52.577 37.594,52.923 -0.155,52.998 17.016,53.009 -0.805,53.075 18.411,53.153 20.55,53.155 15.614,53.295 4.48,53.568 6.901,53.849 7.501,53.849 8.101,53.849 5.877,54.227 6.901,54.449 7.501,54.449 8.101,54.449 9.016,54.733 6.276,54.939 22.915,54.925 6.901,55.049 16.814,55.094 17.545,55.278 18.299,55.285 19.053,55.285 20.561,55.285 21.314,55.327 5.884,55.397 6.901,55.649 21.791,55.911 5.701,56.249 6.301,56.249 6.901,56.249 23.209,56.385 5.701,56.849 6.301,56.849 6.901,56.849 23.209,57.139 21.805,57.419 5.701,57.449 6.301,57.449 6.901,57.449 16.37,58.037 28.645,58.037 40.92,58.037 53.195,58.037 6.301,58.049 6.901,58.049 15.484,58.403 17.255,58.403 29.53,58.403 40.034,58.403 41.805,58.403 52.309,58.403 54.08,58.403 6.301,58.649 6.901,58.649 23.289,58.643 21.649,58.71 6.901,59.249 15.117,59.289 29.897,59.289 39.667,59.289 54.447,59.289 15.484,60.175 17.255,60.175 27.759,60.175 29.53,60.175 40.034,60.175 41.805,60.175 52.309,60.175 54.08,60.175 16.37,60.542 28.645,60.542 40.92,60.542 53.195,60.542
  other v5: 59.872,-4.177 48.773,-3.963 49.527,-3.963 51.789,-3.963 52.543,-3.963 54.051,-3.963 54.805,-3.963 55.559,-3.963 56.313,-3.963 48.019,-3.935 58.511,-3.66 46.272,-3.615 59.954,-3.427 47.706,-3.25 59.954,-2.673 59.954,-1.919 46.27,-1.353 59.954,-1.165 47.706,-0.988 47.272,0.414 46.599,0.753 59.954,1.097 59.954,1.851 58.519,9.912 53.033,12.018 56.639,12.437 52.46,12.509 56.974,13.877 55.539,14.732 56.974,15.385 55.539,15.486 55.539,16.24 56.974,16.893 56.9,17.643 56.478,18.268 54.038,18.677 55.944,18.801 53.505,19.21 55.411,19.334 54.052,22.122 54.806,22.122 55.56,22.124 53.299,22.16 56.273,22.371 50.306,22.409 52.641,22.529 49.773,22.942 56.749,22.956 52.271,23.185 49.24,23.475 54.373,23.558 55.127,23.558 56.865,23.701 50.613,24.133 56.865,24.455 50.08,24.666 52.668,24.769 55.429,25.003 47.64,25.075 47.107,25.608 56.865,25.963 55.429,26.511 56.865,26.717 47.947,26.798 56.865,27.471 58.519,28.008 56.865,28.225 55.429,28.773 58.519,28.762 43.908,28.807 56.865,28.979 43.375,29.34 45.281,29.464 58.519,29.516 55.429,29.527 52.429,29.682 53.183,29.682 53.937,29.682 54.691,29.682 56.865,29.733 59.954,29.749 42.842,29.873 49.447,29.91 44.748,29.997 58.519,30.27 42.309,30.406 56.729,30.474 41.775,30.94 56.186,30.998 58.519,31.024 37.268,31.096 40.284,31.096 53.934,31.118 54.688,31.118 55.442,31.118 52.602,31.128 50.165,31.159 36.518,31.18 59.954,31.257 35.805,31.425 65.357,31.526 62.838,31.566 58.519,31.778 50.055,31.905 59.954,32.011 61.532,32.091 42.605,32.119 65.541,32.257 54.479,32.359 55.233,32.359 55.981,32.454 62.184,32.47 60.903,32.507 58.53,32.532 50.065,32.587 36.666,32.63 62.89,32.852 36.015,33.01 65.429,33.003 35.575,33.622 57.059,33.61 54.406,33.795 55.16,33.795 59.043,33.951 59.915,34.162 60.666,34.222 61.42,34.222 62.174,34.222 63.472,34.223 35.424,34.361 57.068,34.364 49.929,34.91 35.424,35.115 57.068,35.118 55.632,35.253 46.954,35.595 35.405,35.869 57.068,35.872 55.632,36.007 48.331,36.454 31.585,36.481 29.324,36.52 30.078,36.516 30.832,36.516 57.068,36.626 28.613,36.77 55.632,36.761 28.136,37.355 57.068,37.38 27.553,37.833 29.699,37.952 30.453,37.952 31.207,37.952 57.068,38.134 25.87,39.06 28.737,39.104 28.001,39.268 42.616,39.919 43.37,39.919 44.124,39.919 44.878,39.919 45.632,39.919 46.386,39.919 41.868,40.015 40.125,41.423 42.024,41.554 53.542,41.57 39.591,41.956 53.008,42.103 50.444,42.637 33.544,43.15 56.63,43.134 49.911,43.171 49.378,43.704 51.409,43.703 39.06,43.74 31.465,43.759 36.914,43.75 37.552,43.748 38.306,43.748 29.296,43.791 56.948,43.818 52.234,43.95 54.409,44.031 55.163,44.031 33.091,44.115 48.844,44.237 33.553,44.711 50.343,44.769 30.854,45.248 31.608,45.248 49.809,45.302 56.974,45.325 55.539,45.439 47.245,45.836 56.974,46.079 31.102,46.172 55.539,46.193 33.672,46.209 46.712,46.37 32.236,46.42 31.455,46.839 48.21,46.902 33.672,46.963 55.539,46.947 32.236,47.174 47.677,47.435 31.478,47.592 56.974,47.587 33.672,47.717 32.236,47.928 31.478,48.346 56.974,48.341 33.672,48.471 30.042,48.577 32.236,48.682 44.046,49.035 31.478,49.1 56.974,49.095 33.672,49.225 55.539,49.209 30.042,49.331 32.236,49.436 43.513,49.569 31.478,49.854 56.974,49.849 55.539,49.963 33.672,49.979 30.042,50.085 42.98,50.102 45.011,50.101 32.236,50.19 37.142,50.454 31.478,50.608 33.672,50.733 30.042,51.593 32.25,51.697 31.478,52.116 32.538,52.394 45.491,55.753 46.999,55.753 48.507,55.753 52.277,55.753 53.031,55.753 53.785,55.753 54.539,55.753